# Allegro board DRV8711_TEST_V10A.brd
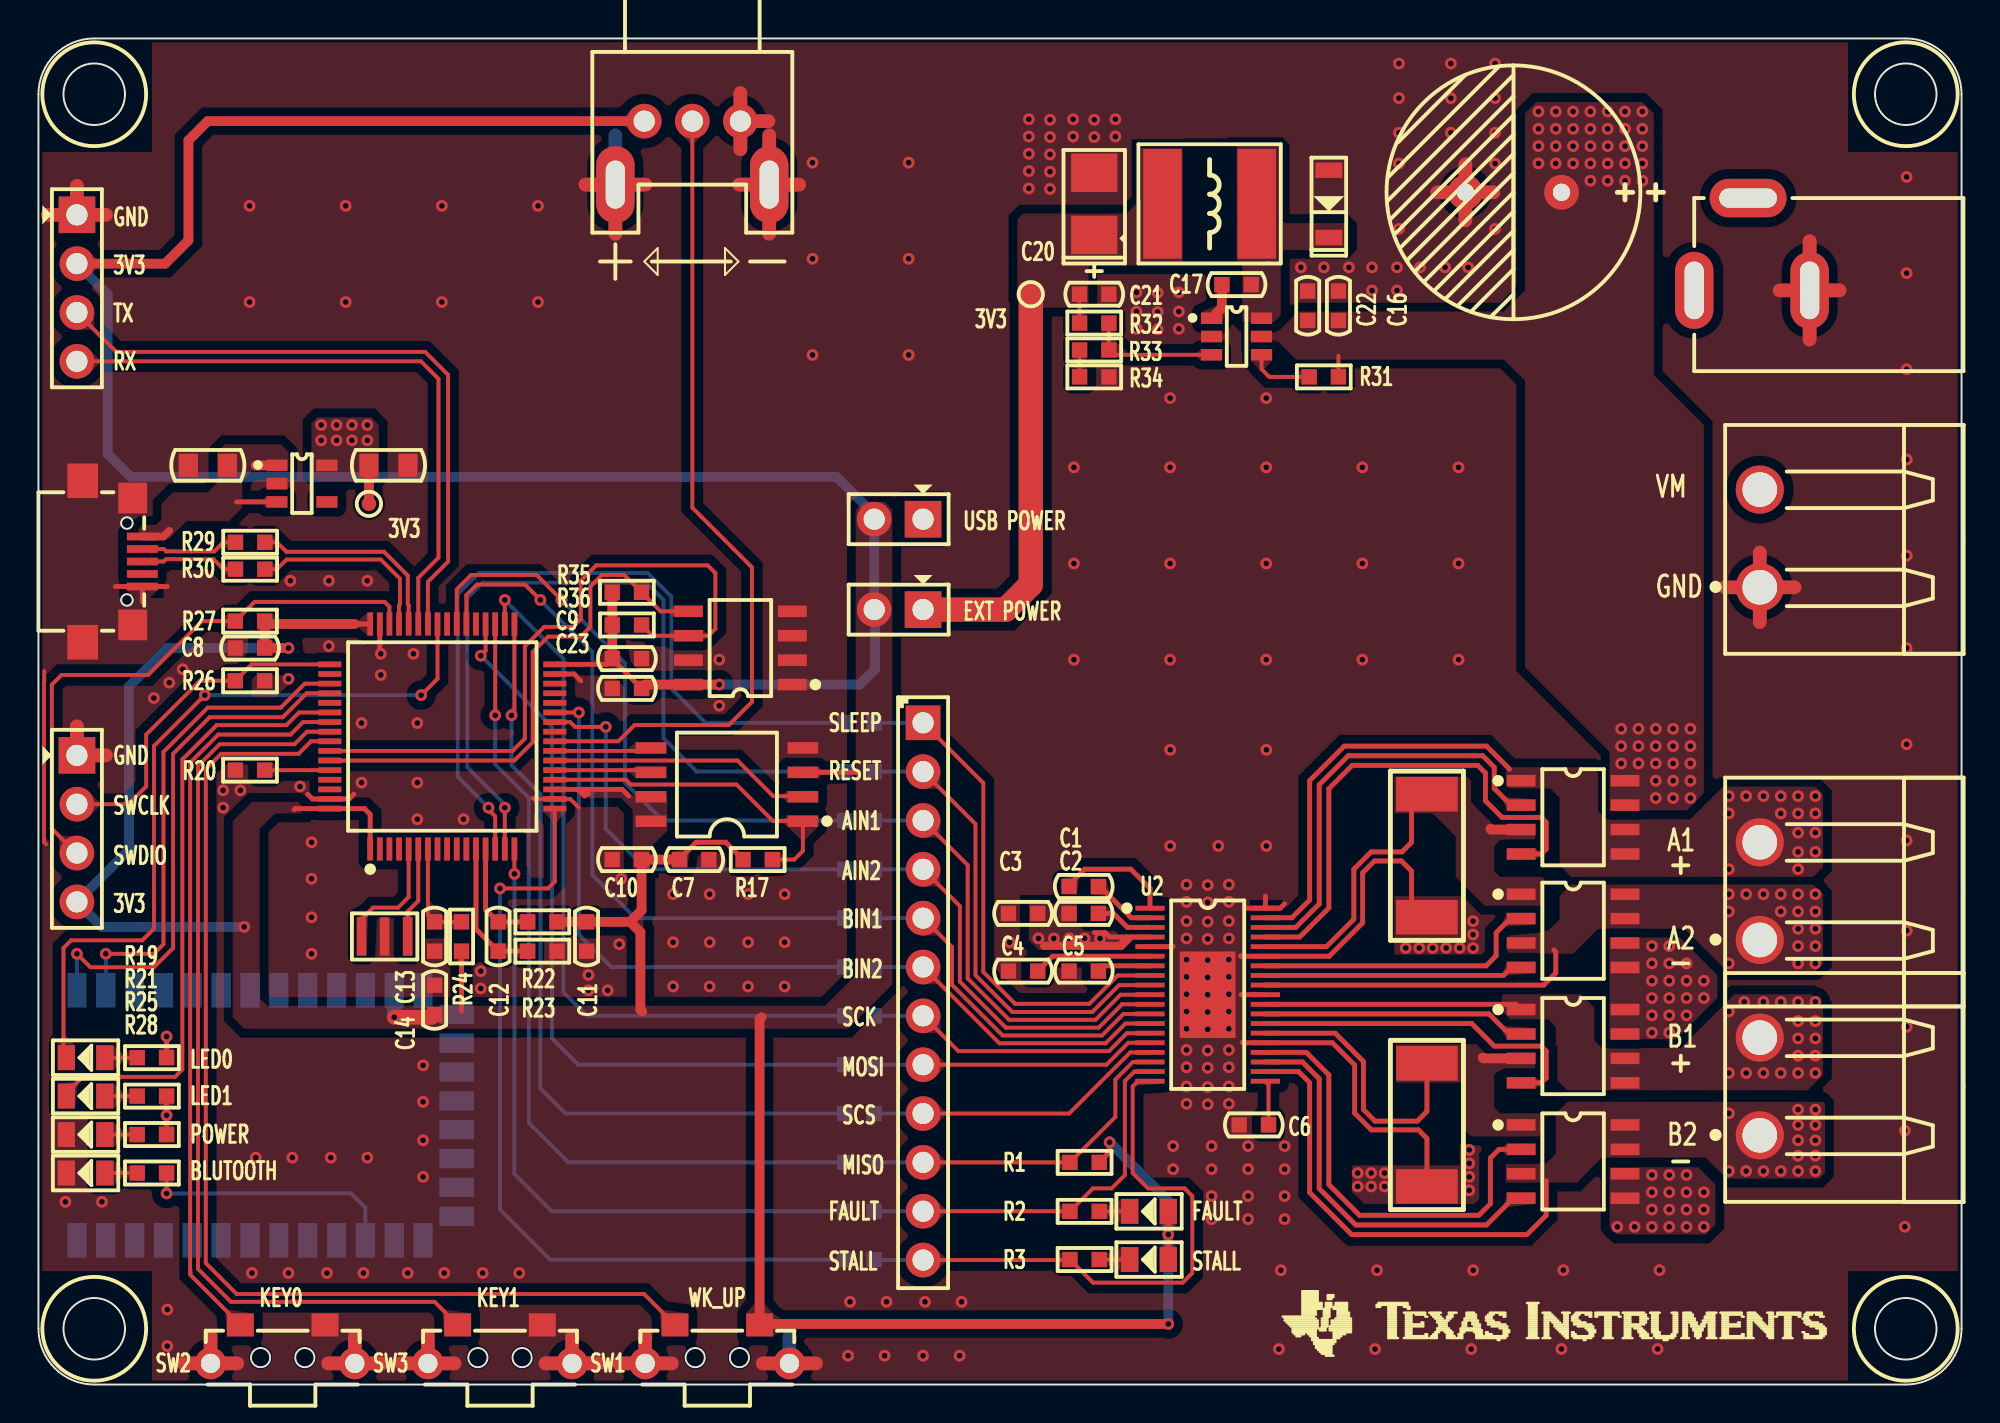
[diagram p0: board, top side]
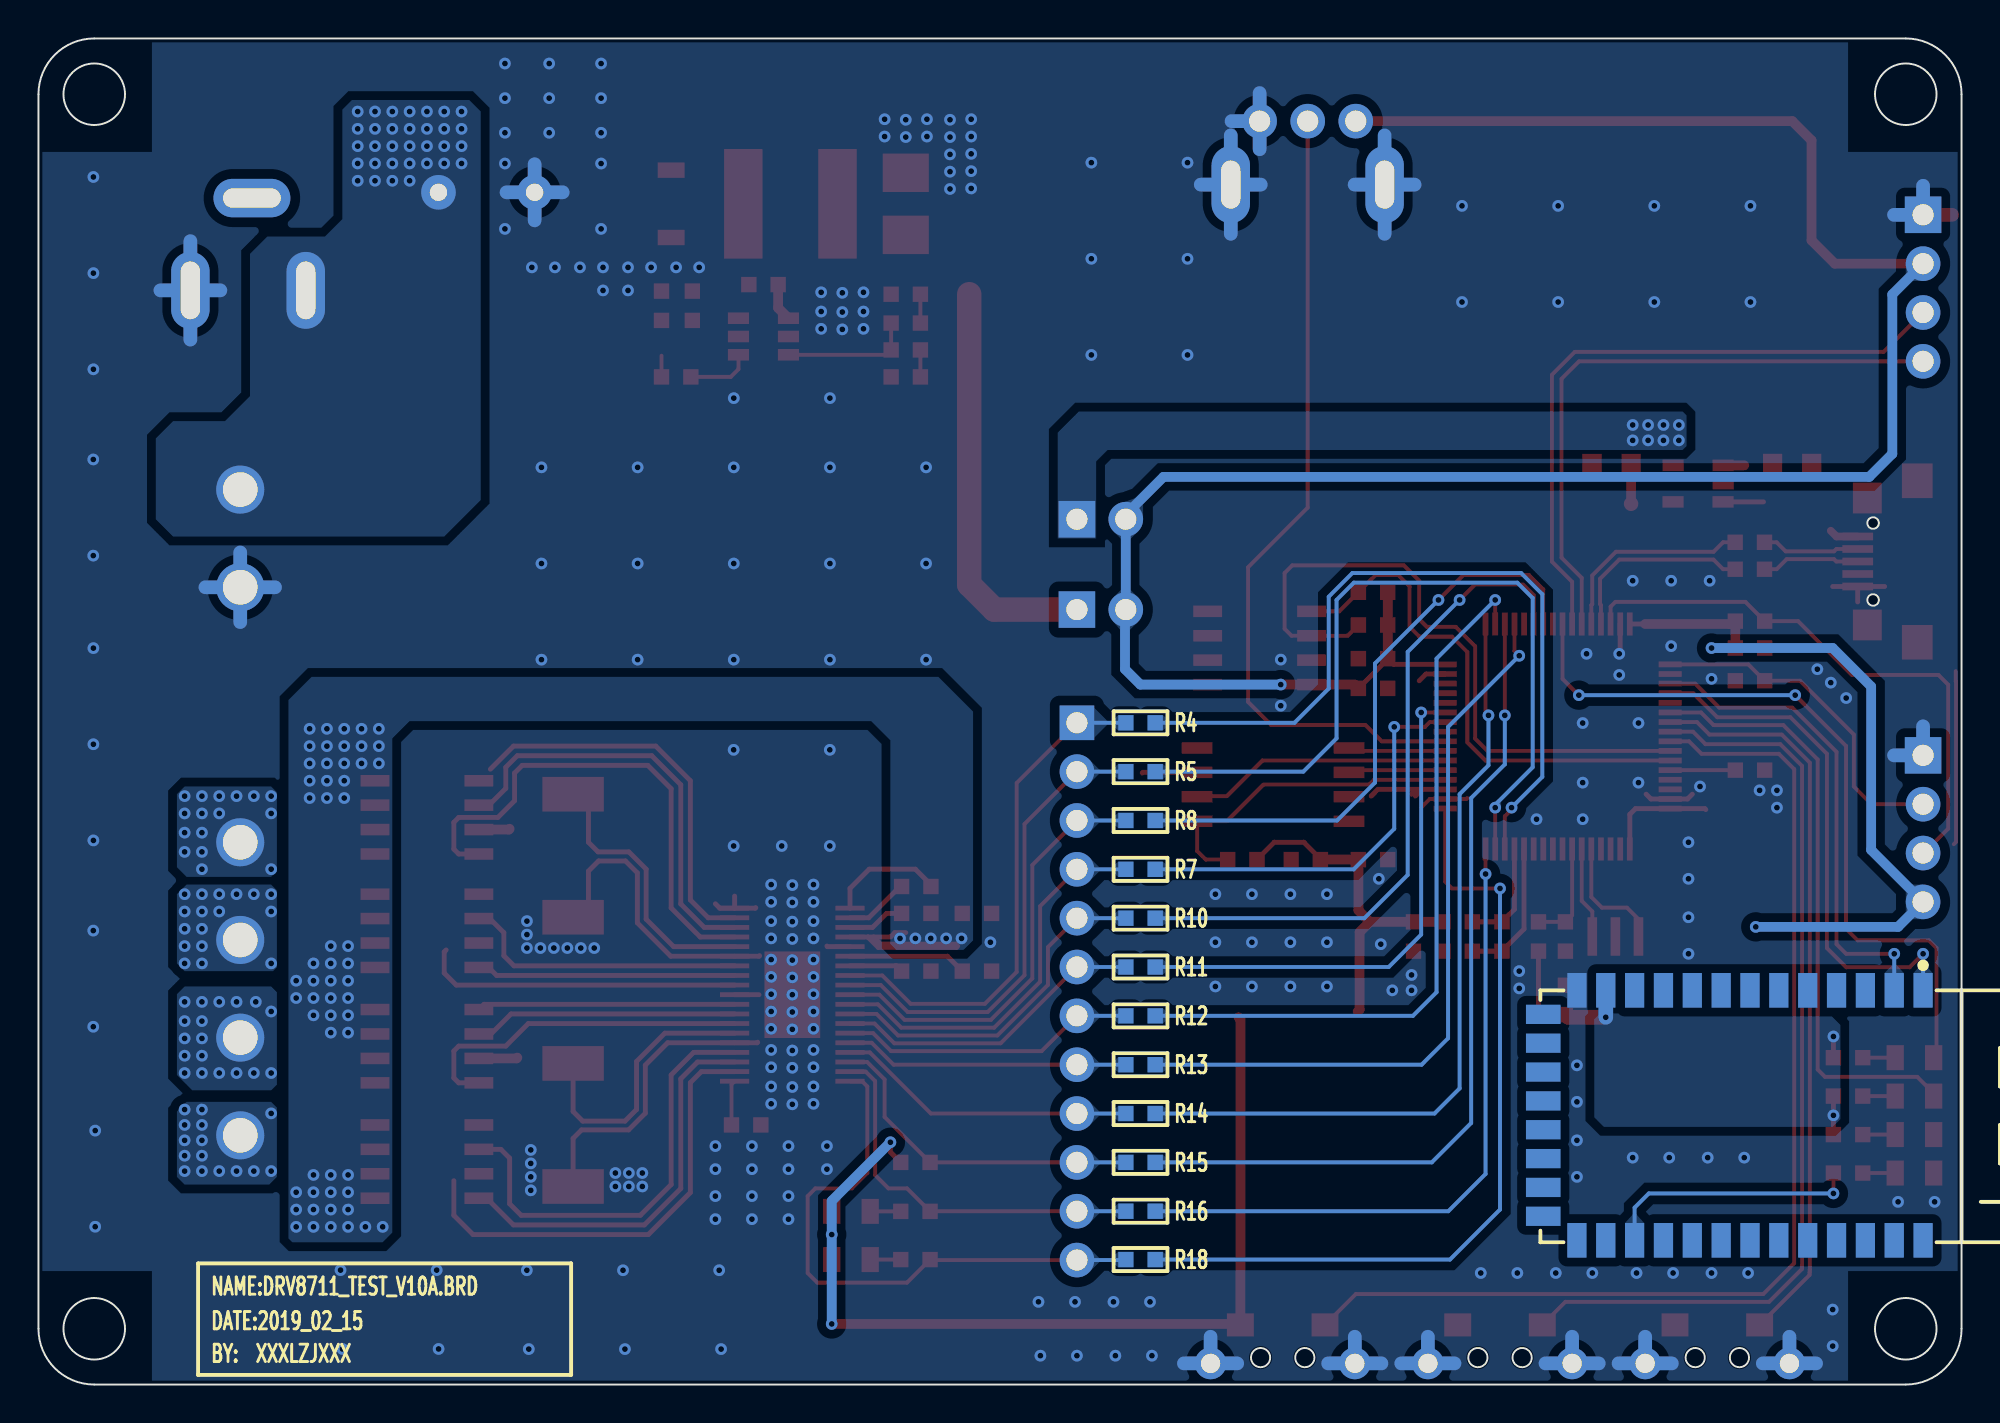
[diagram p1: board, bottom side, seen from below]

Outline 100 x 70 mm; copper layers: TOP, BOTTOM. Coordinates in mm from the lower left corner of the outline.
Outline path: circle c2.9,67.1 r1.6 ; circle c2.9,2.9 r1.6 ; circle c97.1,67.1 r1.6 ; circle c97.1,2.9 r1.6 ; 0,67.1 0,2.9 arc(0.85,0.85) 2.9,0 97.1,0 arc(99.15,0.85) 100,2.9 100,67.1 arc(99.15,69.15) 97.1,70 2.9,70 arc(0.85,69.15) 0,67.1

## Design rules (mm)
constraint set DEFAULT: min track width 0.203, pair gap 0.203
net group *USB_D: nets USB_D+ USB_D-
net group DP1: nets USB_DM USB_DP

## Placement (name value [footprint] x y rotation side)
C1  0.1uF_50V  [C0603]  54.35 25.9 0 top
C2  1uF_50V  [C0603]  54.35 24.5 180 top
C3  1uF_50V  [C0603]  51.2 24.5 180 top
C4  0.1uF_50V  [C0603]  51.2 21.5 180 top
C5  1uF_50V  [C0603]  54.35 21.5 180 top
C6  1nF_50V  [C0603]  63.2 13.5 0 top
C7  0.1uF_50V  [C0603]  34.1 27.3 0 top
C8  0.1uF_50V  [C0603]  11 38.3 0 top
C9  0.1uF_50V  [C0603]  30.6 37.75 180 top
C10  0.1uF_50V  [C0603]  30.6 27.3 0 top
C11  0.1uF_50V  [C0603]  28.5 23.3 90 top
C12  0.1uF_50V  [C0603]  23.9 23.3 90 top
C13  0.1uF_50V  [C0603]  20.6 23.3 270 top
C14  0.1uF_50V  [C0603]  20.6 20 270 top
C15  1000uF_50V  [CAP-5R0-13X27]  76.7 62 180 top
C16  10nF_50V  [C0603]  67.6 56.1 90 top
C17  10nF_50V  [C0603]  62.3 57.2 0 top
C18  10uF_25V  [C0805]  8.81 47.8 180 top
C19  10uF_25V  [C0805]  18.2 47.8 0 top
C20  47uF_10V  [C3528B]  54.9 61.4 270 top
C21  0.1uF_25V  [C0603]  54.9 56.7 0 top
C22  0.1uF_25V  [C0603]  66 56.1 90 top
C23  0.1uF_50V  [C0603]  30.6 36.2 0 top
D1  LED_GREEN  [LED0805]  57.75 9.01 180 top
D2  LED_GREEN  [LED0805]  57.75 6.5 180 top
D3  LED_GREEN  [LED0805]  2.45 17 180 top
D4  LED_GREEN  [LED0805]  2.45 15 180 top
D5  LED_GREEN  [LED0805]  2.45 13 180 top
D6  LED_GREEN  [LED0805]  2.45 11 180 top
D7  LMBR0520T1G  [SOD123]  67.1 61.4 90 top
DC1  -  [DC005]  92.1 56.9 180 top
J1  -  [HEADER12X1-2R54-M]  46 34.41 270 top
J2  -  [WJ2EDGRC-5R08-2P]  89.51 25.66 90 top
J3  -  [WJ2EDGRC-5R08-2P]  89.51 15.5 90 top
J4  -  [HEADER4X1-2R54-M]  2 32.72 270 top
J5  -  [HEADER4X1-2R54-M]  2 60.83 270 top
J6  -  [WJ2EDGRC-5R08-2P]  89.51 44 90 top
J7  -  [HEADER2X1-2R54-M]  46 45 180 top
J8  -  [HEADER2X1-2R54-M]  46 40.3 180 top
L1  SLF6028T-4R7M1R6-PF  [L6028]  60.9 61.4 180 top
NOREF  -  []  0 0 90 top
NOREF#2  -  []  98.12 68.33 0 top
NOREF#3  -  []  -0.21 0 0 top
NOREF#4  -  []  0 0 0 top
NOREF#5  -  []  0 0 0 top
NOREF#6  -  []  0 0 90 top
NOREF#7  -  []  0 0 90 top
NOREF#8  -  []  0 0 0 top
Q1  IRF7351TRPBF  [SOIC8]  79.8 29.5 270 top
Q2  IRF7351TRPBF  [SOIC8]  79.8 23.6 270 top
Q3  IRF7351TRPBF  [SOIC8]  79.8 17.6 270 top
Q4  IRF7351TRPBF  [SOIC8]  79.8 11.6 270 top
R1  4.7K  [R0603]  54.4 11.55 180 top
R2  10K  [R0603]  54.4 9.01 180 top
R3  10K  [R0603]  54.4 6.5 180 top
R4  0R  [R0603]  42.69 34.41 0 bottom
R5  0R  [R0603]  42.69 31.87 0 bottom
R6  0R05  [R2512]  72.2 27.5 90 top
R7  0R  [R0603]  42.69 26.79 0 bottom
R8  0R  [R0603]  42.69 29.33 0 bottom
R9  0R05  [R2512]  72.2 13.5 90 top
R10  0R  [R0603]  42.69 24.25 0 bottom
R11  0R  [R0603]  42.69 21.71 0 bottom
R12  0R  [R0603]  42.69 19.17 0 bottom
R13  0R  [R0603]  42.69 16.63 0 bottom
R14  0R  [R0603]  42.69 14.09 0 bottom
R15  0R  [R0603]  42.69 11.55 0 bottom
R16  0R  [R0603]  42.69 9.01 0 bottom
R17  10K  [R0603]  37.4 27.3 0 top
R18  0R  [R0603]  42.69 6.5 0 bottom
R19  10K  [R0603]  5.9 17 180 top
R20  10K  [R0603]  11 31.95 180 top
R21  10K  [R0603]  5.9 15 180 top
R22  0R  [R0603]  26.2 24.06 0 top
R23  0R  [R0603]  26.2 22.54 0 top
R24  10K  [R0603]  22 23.3 90 top
R25  10K  [R0603]  5.9 13 180 top
R26  10K  [R0603]  11 36.6 180 top
R27  10K  [R0603]  11 39.7 180 top
R28  10K  [R0603]  5.9 11 180 top
R29  0R  [R0603]  11.01 43.8 0 top
R30  0R  [R0603]  11.01 42.4 0 top
R31  100K  [R0603]  66.84 52.4 180 top
R32  49.9K  [R0603]  54.9 55.2 0 top
R33  6.2K  [R0603]  54.9 53.8 180 top
R34  10K  [R0603]  54.9 52.4 0 top
R35  4.7K  [R0603]  30.6 41.2 180 top
R36  4.7K  [R0603]  30.6 39.5 180 top
RP1  RK09K1110A0J  [R09-B103-3P]  34 65.7 180 top
SW1  -  [K2-1112SW-A4SW-04]  35.3 1.4 180 top
SW2  -  [K2-1112SW-A4SW-04]  12.7 1.4 180 top
SW3  -  [K2-1112SW-A4SW-04]  24 1.4 180 top
TP1  TestPoint  [TP-0R75]  17.18 45.8 0 top
TP2  TestPoint  [TP-0R75]  51.6 56.7 0 top
U1  STM32F103RCT6  [LQFP64-10X10X0R5]  21 33.7 0 top
U2  DRV8711DCPR  [HTSSOP38]  60.8 20.27 270 top
U3  W25Q64JVSSIQ  [SOIC8_208]  35.8 31.2 90 top
U4  -  [HC-06]  2 20.5 270 bottom
U5  RT9193-33GB  [SOT23-5]  13.7 46.85 270 top
U6  MP2359DJ-LF-Z  [SOT23-6]  62.3 54.5 270 top
U10  AT24C512C-SSHM-T  [SOIC8]  36.5 38.3 90 top
USB1  USB-MICRO  [USB-U-F-M5SS-W-1]  2.3 42.8 270 top
X1  CSTCE8M00G15C99-R0  [X-3P-3R2X1R3-SMD]  18 23.3 0 top

## Library data of the parts
C1-C12 C14 C16 C17 = CAP NP_2
C13 C21 C22 = CAP NP
C15 = CAPT_100UF_3528_6r3V_10%_LXXXX
C18 C19 C23 = CAP NP_3
C20 = TMP_154254
D1-D6 = LED_4
D7 = DIODE13_7
DC1 = DC005
J1 = CONN RCPT 12
J2 J3 J6 = CONN RCPT 2
J4 J5 = CONN RCPT 4
J7 J8 = HDR_1
L1 = INDUCTOR_0
Q1-Q4 = IRF7351TRPBF
R1-R36 = R_Generic
RP1 = RESISTOR VAR_1
SW1-SW3 = SWITCH-SPST-4P
TP1 TP2 = TestPoint
U1 = STM32F103RxT6
U2 = DRV8711DCPR
U3 = W25Qxx
U4 = HC-06_0
U5 = SPX3819M5-L-1-2
U6 = MP2359DJ-LF-Z
U10 = AT24C512
USB1 = USB-MICRO
X1 = XTAL_5032_0

## Footprints (pads in the part's own frame, mm; a bottom-side part is the same pattern mirrored in y, then rotated)
C0603
  rect 0.8x0.8 smd: 1(-0.762,0) 2(0.762,0)
C0805
  rect 1x1.2 smd: 1(-1.016,0) 2(1.016,0)
C3528B
  rect 2x2.4 smd: 1(1.615,0) 2(-1.614,0)
CAP-5R0-13X27
  round 1.8 hole 0.9: 1(-2.5,0) 2(2.5,0)
DC005
  oval 2x4 hole 1x3: 1(6,0) 2(0,0)
  oval 4x2 hole 3x1: 3(3.2,-4.8)
HC-06
  rect 1.8x1 smd: 1(0,0) 2(0,-1.5) 3(0,-3) 4(0,-4.5) 5(0,-6) 6(0,-7.5) 7(0,-9) 8(0,-10.5) 9(0,-12) 10(0,-13.5) 11(0,-15) 12(0,-16.5) 13(0,-18) 22(13,-18) 23(13,-16.5) 24(13,-15) 25(13,-13.5) 26(13,-12) 27(13,-10.5) 28(13,-9) 29(13,-7.5) 30(13,-6) 31(13,-4.5) 32(13,-3) 33(13,-1.5) 34(13,0)
  rect 1x1.8 smd: 14(1.25,-19.75) 15(2.75,-19.75) 16(4.25,-19.75) 17(5.75,-19.75) 18(7.25,-19.75) 19(8.75,-19.75) 20(10.25,-19.75) 21(11.75,-19.75)
HEADER2X1-2R54-M
  rect 1.9x1.9 hole 1.1: 1(0,0)
  round 1.8 hole 1.1: 2(2.54,0)
HEADER4X1-2R54-M
  rect 1.9x1.9 hole 1.1: 1(0,0)
  round 1.8 hole 1.1: 2(2.54,0) 3(5.08,0) 4(7.62,0)
HEADER12X1-2R54-M
  rect 1.8x1.8 hole 1.1: 1(0,0)
  round 1.8 hole 1.1: 2(2.54,0) 3(5.08,0) 4(7.62,0) 5(10.16,0) 6(12.7,0) 7(15.24,0) 8(17.78,0) 9(20.32,0) 10(22.86,0) 11(25.4,0) 12(27.94,0)
HTSSOP38
  rect 0.25x1.52 smd: 1(-4.5,-3) 2(-4,-3) 3(-3.5,-3) 4(-3,-3) 5(-2.5,-3) 6(-2,-3) 7(-1.5,-3) 8(-1,-3) 9(-0.5,-3) 10(0,-3) 11(0.5,-3) 12(1,-3) 13(1.5,-3) 14(2,-3) 15(2.5,-3) 16(3,-3) 17(3.5,-3) 18(4,-3) 19(4.5,-3) 20(4.5,3) 21(4,3) 22(3.5,3) 23(3,3) 24(2.5,3) 25(2,3) 26(1.5,3) 27(1,3) 28(0.5,3) 29(0,3) 30(-0.5,3) 31(-1,3) 32(-1.5,3) 33(-2,3) 34(-2.5,3) 35(-3,3) 36(-3.5,3) 37(-4,3) 38(-4.5,3)
  rect 4.5x2.9 smd: 39(0,0)
K2-1112SW-A4SW-04
  round 1.65 hole 1: 1(-3.75,0.3) 4(3.75,0.3)
  rect 1.4x1.2 smd: 2(-2.2,-1.7) 3(2.2,-1.7)
L6028
  rect 2x5.7 smd: 1(-2.45,0) 2(2.45,0)
LED0805
  rect 0.9x1.3 smd: 1(-1,0) 2(1,0)
LQFP64-10X10X0R5
  rect 0.3x1.2 smd: 1(-3.75,-5.85) 2(-3.25,-5.85) 3(-2.75,-5.85) 4(-2.25,-5.85) 5(-1.75,-5.85) 6(-1.25,-5.85) 7(-0.75,-5.85) 8(-0.25,-5.85) 9(0.25,-5.85) 10(0.75,-5.85) 11(1.25,-5.85) 12(1.75,-5.85) 13(2.25,-5.85) 14(2.75,-5.85) 15(3.25,-5.85) 16(3.75,-5.85) 33(3.75,5.85) 34(3.25,5.85) 35(2.75,5.85) 36(2.25,5.85) 37(1.75,5.85) 38(1.25,5.85) 39(0.75,5.85) 40(0.25,5.85) 41(-0.25,5.85) 42(-0.75,5.85) 43(-1.25,5.85) 44(-1.75,5.85) 45(-2.25,5.85) 46(-2.75,5.85) 47(-3.25,5.85) 48(-3.75,5.85)
  rect 1.2x0.3 smd: 17(5.85,-3.75) 18(5.85,-3.25) 19(5.85,-2.75) 20(5.85,-2.25) 21(5.85,-1.75) 22(5.85,-1.25) 23(5.85,-0.75) 24(5.85,-0.25) 25(5.85,0.25) 26(5.85,0.75) 27(5.85,1.25) 28(5.85,1.75) 29(5.85,2.25) 30(5.85,2.75) 31(5.85,3.25) 32(5.85,3.75) 49(-5.85,3.75) 50(-5.85,3.25) 51(-5.85,2.75) 52(-5.85,2.25) 53(-5.85,1.75) 54(-5.85,1.25) 55(-5.85,0.75) 56(-5.85,0.25) 57(-5.85,-0.25) 58(-5.85,-0.75) 59(-5.85,-1.25) 60(-5.85,-1.75) 61(-5.85,-2.25) 62(-5.85,-2.75) 63(-5.85,-3.25) 64(-5.85,-3.75)
R09-B103-3P
  round 1.8 hole 1.1: 1(-2.5,0) 2(0,0) 3(2.5,0)
  oval 2x4 hole 1x2.5: 4(-4,3.3) 5(4,3.3)
R0603
  rect 0.8x0.8 smd: 1(-0.762,0) 2(0.762,0)
R2512
  rect 1.8x3.2 smd: 1(-3.2,0) 2(3.2,0)
SOD123
  rect 0.8x1.4 smd: 1(1.75,0) 2(-1.75,0)
SOIC8
  rect 0.6x1.5 smd: 1(-1.9,-2.7) 2(-0.63,-2.7) 3(0.64,-2.7) 4(1.91,-2.7) 5(1.91,2.7) 6(0.64,2.7) 7(-0.63,2.7) 8(-1.9,2.7)
SOIC8_208
  rect 0.6x1.6 smd: 1(-1.905,-3.95) 2(-0.635,-3.95) 3(0.635,-3.95) 4(1.905,-3.95) 5(1.905,3.95) 6(0.635,3.95) 7(-0.635,3.95) 8(-1.905,3.95)
SOT23-5
  rect 0.6x1.1 smd: 1(-0.95,-1.3) 2(0,-1.3) 3(0.95,-1.3) 4(0.95,1.3) 5(-0.95,1.3)
SOT23-6
  rect 0.6x1.1 smd: 1(-0.95,-1.3) 2(0,-1.3) 3(0.95,-1.3) 4(0.95,1.3) 5(0,1.3) 6(-0.95,1.3)
TP-0R75
  round 0.75 smd: 1(0,0)
USB-U-F-M5SS-W-1
  rect 0.4x1.6 smd: 1(-1.3,3.1) 2(-0.65,3.1) 3(0,3.1) 4(0.65,3.1) 5(1.3,3.1)
  rect 1.6x1.5 smd: 6(-3.3,2.6) 7(3.3,2.6)
  rect 1.8x1.6 smd: 8(-4.2,0) 9(4.2,0)
WJ2EDGRC-5R08-2P
  round 2.5 hole 1.8: 1(-2.54,0) 2(2.54,0)
X-3P-3R2X1R3-SMD
  rect 0.5x2 smd: 1(-1.2,0) 2(0,0) 3(1.2,0)

## Nets
GND: C3.2 C4.2 C5.2 C6.1 C7.2 C8.1 C9.1 C10.1 C11.1 C13.2 C14.1 C15.2 C16.2 C18.2 C19.2 C20.2 C21.2 C22.2 C23.1 D5.2(CATHODE) D6.2(CATHODE) D7.1 DC1.2 J4.1 J5.1 J6.1 R6.1 R9.1 R20.2 R23.2 R26.1 R34.2 RP1.1 RP1.4 RP1.5 SW1.1 SW1.4 SW2.1 SW2.2 SW2.4 SW3.1 SW3.2 SW3.4 U1.18 U1.31 U1.47 U1.63(VSS_4) U2.5 U2.24 U2.29 U2.33 U2.38 U2.39 U3.4 U4.13 U5.2 U6.2 U10.1 U10.2 U10.3 U10.4 U10.7(WP) USB1.5 USB1.6 USB1.7 USB1.8 USB1.9 X1.2
VCC_3.3V: C7.1 C8.2 C9.2 C10.2 C11.2 C14.2 C23.2 D1.1 D2.1 J4.4 J5.2 J7.2 J8.2 R1.1 R17.1 R19.1 R21.1 R22.2 R24.1 R25.1 R27.1 R35.2 R36.2 RP1.3 SW1.2 U1.1 U1.19 U1.32 U1.48 U1.64 U3.3(W\P\) U3.7 U3.8 U4.12(VCC) U10.8
VCC_VBUS: C18.1 U5.1 U5.3 USB1.1(VBUS)
VDDA: C12.2 R22.1 U1.13
VSSA: C12.1 R23.1 U1.12
A1HS: Q1.2 U2.36
A1LS: Q1.4 U2.35
A2HS: Q2.4 U2.31
A2LS: Q2.2 U2.32
AISENP: Q1.3(S2) Q2.1 R6.2 U2.34
AOUT1: J2.2 Q1.1 Q1.5 Q1.6 U2.37
AOUT2: J2.1 Q2.3(S2) Q2.7 Q2.8 U2.30
B1HS: Q3.2 U2.27
B1LS: Q3.4 U2.26
B2HS: Q4.4 U2.22
B2LS: Q4.2 U2.23
BEMF: C6.2 U2.20
BIN1: J1.5 R10.2 U2.12
BIN2: J1.6 R11.2 U2.13
BISENP: Q3.3(S2) Q4.1 R9.2 U2.25
BOOT0: R20.1 U1.60
BOUT1: J3.2 Q3.1 Q3.5 Q3.6 U2.28
BOUT2: J3.1 Q4.3(S2) Q4.7 Q4.8 U2.21
DIR/AIN2: J1.4 R7.2 U2.11
IIC_SCL: R36.1 U1.58 U10.6
IIC_SDA: R35.1 U1.59 U10.5
KEY0: SW2.3 U1.55
KEY1: SW3.3 U1.56
LED0: D3.2(CATHODE) U1.41
LED1: D4.2(CATHODE) U1.54
NFAULT: J1.11 R2.2 R16.2 U2.18
NRST: C13.1 R24.2 U1.7
NSLEEP: J1.1 R4.2 U2.8
NSTALL: J1.12 R3.2 R18.2 U2.19
OSC_IN: U1.5 X1.1
OSC_OUT: U1.6 X1.3
POT: RP1.2(WIPER) U1.24
RESET: J1.2 R5.2 U2.9
SCLK: J1.7 R12.2 U2.14
SCS: J1.9 R14.2 U2.16
SDATI: J1.8 R13.2 U2.15
SDATO: J1.10 R1.2 R15.2 U2.17
SPI1_CS: R17.2 U1.20 U3.1
SPI1_MISO: U1.22 U3.2
SPI1_MOSI: U1.23 U3.5
SPI1_SCK: U1.21 U3.6
STEP/AIN1: J1.3 R8.2 U2.10
SWCLK: J4.2 R26.2 U1.49
SWDIO: J4.3 R27.2 U1.46
T_BIN1: R10.1 U1.38
T_BIN2: R11.1 U1.27
T_DIR/AIN2: R7.1 U1.26
T_NFAULT: R16.1 U1.16
T_NSLEEP: R4.1 U1.14
T_NSTALL: R18.1 U1.17
T_RESET: R5.1 U1.15
T_SCLK: R12.1 U1.34
T_SCS: R14.1 U1.33
T_SDATI: R13.1 U1.36
T_SDATO: R15.1 U1.35
T_STEP/AIN1: R8.1 U1.39
USART1_RX: J5.4 U1.43
USART1_TX: J5.3 U1.42
USART4_RX: U1.52 U4.1
USART4_TX: U1.51 U4.2
USB_D+: R30.1 USB1.3
USB_D-: R29.1 USB1.2
USB_DM: R29.2 U1.44
USB_DP: R30.2 U1.45
VM: C2.2 C3.1 C15.1 C16.1 C22.1 DC1.1 J6.2 Q1.7 Q1.8 Q2.5 Q2.6 Q3.7 Q3.8 Q4.5 Q4.6 R31.1 U2.4(VM) U6.5
WK_UP: SW1.3 U1.57
N16860643: C19.1 J7.1 TP1.1 U5.5(VOUT)
N17026698: D4.1 R21.2
N17026724: D5.1 R25.2
N17049848: C1.1 U2.1
N17049851: C1.2 U2.2
N17050982: C2.1 U2.3
N17051347: C4.1 U2.6
N17051352: C5.1 U2.7
N17052473: D1.2(CATHODE) R2.1
N17052478: D2.2(CATHODE) R3.1
N17062865: D3.1 R19.2
N17067272: C17.2 D7.2(CATHODE) L1.1 U6.6(SW)
N17067274: C17.1 U6.1
N17067309: C20.1 C21.1 J8.1 L1.2 R32.1 TP2.1
N17067388: R32.2 R33.1 U6.3
N17067392: R31.2 U6.4
N17068207: R33.2 R34.1
N17069780: D6.1 R28.2
N17069783: R28.1 U4.24

Pads without a net: DC1 3; U1 2 3 4 8 9 10 11 25 28 29 30 37 40 50 53 61 62; U4 3 4 5 6 7 8 9 10 11 14 15 16 17 18 19 20 21 22 23 25 26 27 28 29 30 31 32 33 34; U5 4; USB1 4

## Via types
v1: diameter 0.61, hole 0.305, TOP to BOTTOM, 445 vias

## Routing (per net, layer and track width the routed paths; a pad name or vN(x,y) marks a point on that pad's centre or on a via; arc(x,y) is an arc through that point)
GND: length 201
  TOP w0.203: 0.4,28.1 0.29,28.21 0.29,36.56 0.3,36.57 0.3,37.1 ; 25.7,30.5 25.75,30.45 U1.18 27.65,30.45 28.1,30
  TOP w0.254: USB1.5 4,41.5 ; USB1.5 6.7,41.5 ; USB1.5 5.4,40.7 ; U2.29 62.53,20.27 ; R9.1 72.2,12.8 71.76,13.24 69.31,13.24 68.44,14.11 68.44,16.61 67.28,17.77 U2.24 62.63,17.77 62.6,17.8 ; U2.38 64.57,24.77 64.8,25 ; U2.38 62.73,24.77 62.7,24.8 ; U2.38 63.8,25.4 ; R6.1 71.4,25.1 71.4,26.7 70.87,27.23 69.47,27.23 68.86,26.61 68.86,24.01 67.12,22.27 U2.33 62.53,22.27 62.5,22.3 ; 28.2,36.6 27.85,36.95 U1.31 ; 14,30.7 14.25,30.45 U1.63 16.15,30.45 16.4,30.7 ; U2.5 58.97,22.77 59,22.8 ; U1.47 17.75,38.05 v1(17.8,38)
  TOP w0.711: SW2.4 10.33,1.1 ; SW2.4 7.57,1.1 ; SW2.4 8.95,2.48 ; J5.1 3.51,60.83 ; J5.1 2,62.34 ; J5.1 0.49,60.83 ; SW2.1 16.45,2.48 ; SW2.1 17.83,1.1 ; SW2.1 15.07,1.1 ; RP1.5 31.56,62.4 ; RP1.5 30,59.84 ; RP1.5 28.44,62.4 ; DC1.2 92.1,59.46 ; DC1.2 92.1,54.34 ; DC1.2 93.66,56.9 ; DC1.2 90.54,56.9 ; 37.67,1.1 SW1.1 40.43,1.1 ; C15.2 75.66,62 ; C15.2 74.2,60.54 ; C15.2 74.2,63.46 ; C15.2 72.74,62 ; SW3.4 20.25,2.48 ; SW3.4 21.63,1.1 ; SW3.4 18.87,1.1 ; 38,59.84 RP1.4 ; RP1.4 36.44,62.4 ; RP1.4 38,64.96 ; RP1.4 39.56,62.4 ; 89.51,39.65 J6.1 ; J6.1 87.7,41.46 ; J6.1 91.32,41.46 ; J6.1 89.51,43.27 ; 26.37,1.1 SW3.1 ; SW3.1 27.75,2.48 ; SW3.1 29.13,1.1 ; SW1.4 32.93,1.1 ; SW1.4 31.55,2.48 ; SW1.4 30.17,1.1 ; RP1.1 37.96,65.7 ; RP1.1 36.5,67.16 ; RP1.1 36.5,64.24 ; 2,34.23 J4.1 3.51,32.72
  BOTTOM w0.711: SW3.1 27.75,2.48 ; SW3.1 26.37,1.1 ; SW3.1 29.13,1.1 ; DC1.2 93.66,56.9 ; DC1.2 92.1,59.46 ; DC1.2 92.1,54.34 ; DC1.2 90.54,56.9 ; 30.17,1.1 SW1.4 ; SW1.4 32.93,1.1 ; SW1.4 31.55,2.48 ; SW2.4 10.33,1.1 ; SW2.4 8.95,2.48 ; SW2.4 7.57,1.1 ; 38,59.84 RP1.4 ; RP1.4 38,64.96 ; RP1.4 39.56,62.4 ; RP1.4 36.44,62.4 ; 72.74,62 C15.2 ; C15.2 74.2,63.46 ; C15.2 75.66,62 ; C15.2 74.2,60.54 ; 89.51,39.65 J6.1 ; J6.1 89.51,43.27 ; J6.1 87.7,41.46 ; J6.1 91.32,41.46 ; SW3.4 20.25,2.48 ; SW3.4 21.63,1.1 ; SW3.4 18.87,1.1 ; 2,62.34 J5.1 3.51,60.83 ; 28.44,62.4 RP1.5 ; RP1.5 30,59.84 ; RP1.5 30,64.96 ; RP1.5 31.56,62.4 ; RP1.1 36.5,67.16 ; RP1.1 36.5,64.24 ; RP1.1 37.96,65.7 ; SW2.1 17.83,1.1 ; SW2.1 15.07,1.1 ; SW2.1 16.45,2.48 ; 37.67,1.1 SW1.1 ; SW1.1 39.05,2.48 ; SW1.1 40.43,1.1 ; 3.51,32.72 J4.1 2,34.23
  vias: v1(1.4,9.5) v1(3.3,9.5) v1(6,35.7) v1(6.7,3.9) v1(6.7,2) v1(6.8,36.5) v1(7.5,37.2) v1(9.6,30.9) v1(9.6,30) v1(10.5,30.9) v1(10.98,61.29) v1(10.98,56.29) v1(11.1,5.8) v1(11.3,11.8) v1(13,36.7) v1(13,5.8) v1(13.1,41.8) v1(13.2,11.8) v1(13.6,31.1) v1(14.2,28.2) v1(14.2,26.3) v1(14.2,24.3) v1(14.2,22.4) v1(15,5.8) v1(15.1,41.8) v1(15.1,38.4) v1(15.2,11.8) v1(15.98,61.29) v1(15.98,56.29) v1(16.8,34.4) v1(16.8,31.3) v1(16.9,5.8) v1(17.1,41.8) v1(17.1,11.8) v1(17.8,36.9) v1(19.2,5.8) v1(19.5,38) v1(19.7,34.4) v1(19.7,31.3) v1(19.7,29.4) v1(20,16.6) v1(20,14.7) v1(20,12.7) v1(20,10.8) v1(20.98,61.29) v1(20.98,56.29) v1(21.1,5.8) v1(22.1,29.4) v1(23,21.5) v1(23,20.6) v1(23.1,5.8) v1(25,5.8) v1(25.98,61.29) v1(25.98,56.29) v1(28.6,21.3) v1(28.6,20.5) v1(29.6,20.5) v1(30.2,22.9) v1(30.3,26.3) v1(33,25.5) v1(33,23) v1(33,20.7) v1(34.9,25.5) v1(34.9,23) v1(34.9,20.7) v1(35.4,37.7) v1(35.4,35.3) v1(36.9,25.5) v1(36.9,23) v1(36.9,20.7) v1(38.8,25.5) v1(38.8,23) v1(38.8,20.7) v1(40.25,63.54) v1(40.25,58.54) v1(40.25,53.54) v1(42.1,1.5) v1(42.2,4.3) v1(44,1.5) v1(44.1,4.3) v1(45.25,63.54) v1(45.25,58.54) v1(45.25,53.54) v1(46,1.5) v1(46.1,4.3) v1(47.9,1.5) v1(48,4.3) v1(50.5,23) v1(51.5,65.8) v1(51.5,64.9) v1(51.5,64) v1(51.5,63.1) v1(51.5,62.2) v1(52.6,65.77) v1(52.6,64.87) v1(52.6,63.97) v1(52.6,63.07) v1(52.6,62.17) v1(53.8,65.8) v1(53.8,64.9) v1(53.84,47.7) v1(53.84,42.7) v1(53.84,37.7) v1(54.9,65.77) v1(54.9,64.87) v1(56,65.8) v1(56,64.9) v1(57.1,56.8) v1(57.1,55.8) v1(57.1,54.9) v1(58.2,56.77) v1(58.2,55.77) v1(58.2,54.87) v1(58.84,51.3) v1(58.84,47.7) v1(58.84,42.7) v1(58.84,37.7) v1(58.85,33.01) v1(58.85,28.01) v1(59,12.4) v1(59,11.2) v1(59.3,56.8) v1(59.3,55.8) v1(59.3,54.9) v1(59.7,26) v1(59.7,25.1) v1(59.7,24.1) v1(59.7,23.2) v1(59.7,22.1) v1(59.7,21.2) v1(59.7,20.3) v1(59.7,19.4) v1(59.7,18.5) v1(59.7,17.4) v1(59.7,16.5) v1(59.7,15.5) v1(59.7,14.6) v1(60.8,25.97) v1(60.8,25.07) v1(60.8,24.07) v1(60.8,23.17) v1(60.8,22.07) v1(60.8,21.17) v1(60.8,20.27) v1(60.8,19.37) v1(60.8,18.47) v1(60.8,17.37) v1(60.8,16.47) v1(60.8,15.47) v1(60.8,14.57) v1(61,12.4) v1(61,11.2) v1(61,9.8) v1(61,8.6) v1(61.35,28.01) v1(61.9,26) v1(61.9,25.1) v1(61.9,24.1) v1(61.9,23.2) v1(61.9,22.1) v1(61.9,21.2) v1(61.9,20.3) v1(61.9,19.4) v1(61.9,18.5) v1(61.9,17.4) v1(61.9,16.5) v1(61.9,15.5) v1(61.9,14.6) v1(62.9,12.4) v1(62.9,11.2) v1(62.9,9.8) v1(62.9,8.6) v1(63.84,51.3) v1(63.84,47.7) v1(63.84,42.7) v1(63.84,37.7) v1(63.85,33.01) v1(63.85,28.01) v1(64.5,1.84) v1(64.6,5.94) v1(64.8,12.4) v1(64.8,11.2) v1(64.8,9.8) v1(64.8,8.6) v1(65.64,58.1) v1(66.84,58.1) v1(68.14,58.1) v1(68.6,11) v1(68.6,10.3) v1(68.84,47.7) v1(68.84,42.7) v1(68.84,37.7) v1(69.34,58.1) v1(69.34,56.9) v1(69.3,11) v1(69.3,10.3) v1(69.5,1.84) v1(69.6,5.94) v1(70,11) v1(70,10.3) v1(70.64,58.1) v1(70.64,56.9) v1(70.74,68.7) v1(70.74,66.9) v1(70.74,65.1) v1(70.74,63.5) v1(70.74,60.1) v1(71.1,22.7) v1(71.84,58.1) v1(71.8,22.7) v1(72.5,22.7) v1(73.14,58.1) v1(73.2,22.7) v1(73.44,68.7) v1(73.44,66.9) v1(73.44,65.1) v1(73.84,47.7) v1(73.84,42.7) v1(73.84,37.7) v1(73.9,22.7) v1(74.34,58.1) v1(74.4,12.2) v1(74.4,11.5) v1(74.4,10.8) v1(74.4,10.1) v1(74.5,1.84) v1(74.6,24.1) v1(74.6,23.4) v1(74.6,22.7) v1(74.6,5.94) v1(75.74,68.7) v1(75.74,66.9) v1(75.74,65.1) v1(75.74,63.5) v1(75.74,60.1) v1(79.19,1.85) v1(79.29,5.95) v1(84.19,1.85) v1(84.29,5.95) v1(97.14,62.8) v1(97.14,57.8) v1(97.14,52.8) v1(97.14,38.3) v1(97.14,33.3) v1(97.14,28.3) v1(97.05,13.21) v1(97.05,8.21) v1(97.15,48.11) v1(97.15,43.11) v1(97.15,23.61) v1(97.15,18.61)
VCC_3.3V: length 249.1
  TOP w0.254: 42.6,31.8 42.56,31.84 U3.3 ; 28.35,30.95 28.6,30.7 ; 28.35,30.95 28.05,30.95 ; 28.35,30.95 30.35,30.95 30.7,30.6 ; R24.1 22,19.4 ; 16.45,39.55 U1.48 ; 28.05,30.95 28.4,30.6 ; 28.05,30.95 U1.19 ; U1.1 17.25,29.65 16.95,29.95 U1.64 13.35,29.95 13.3,29.9 ; C23.2 29.84,37.72 C9.2 29.54,37.45 U1.32 ; D1.1 v1(58.75,7.8) D2.1 ; R1.1 55.7,12.09 v1(55.7,12.6) ; R19.1 v1(6.66,18.1) ; R25.1 v1(6.66,14) R21.1 ; R17.1 35.74,28.2 34.2,28.2 33.34,27.34 C7.1 ; 31.3,27.24 C10.2
  TOP w0.508: 16.45,39.55 11.91,39.55 R27.1 C8.2 v1(13,38.3) ; v1(58.75,3.15) 37.55,3.15 SW1.2 37.5,19 37.6,19.1 ; RP1.3 8.8,65.7 7.8,64.7 7.8,59.5 6.59,58.29 J5.2 ; 30.76,24.06 C11.2 R22.2 ; 30.76,24.06 31.36,24.66 C10.2 C7.1 ; 30.76,24.06 31.3,23.52 31.3,19.5 31.4,19.4 ; R35.2 R36.2 C9.2 ; v1(35.4,36.4) U10.8 31.56,36.4 C23.2
  TOP w0.762: C14.2 20.46,19.1 v1(18.5,19.1)
  BOTTOM w0.508: v1(58.75,3.15) v1(58.75,7.8) 58.75,9.55 v1(55.7,12.6) ; v1(13,38.3) 6.7,38.3 4.7,36.3 4.7,27.8 J4.4 3.3,23.8 v1(10.7,23.8) ; v1(35.4,36.4) 42.7,36.4 43.5,37.2 43.5,40.26 J8.2 J7.2 43.46,45.24 41.5,47.2 4.8,47.2 3.6,48.4 3.6,56.69 J5.2
  BOTTOM w0.762: U4.12 v1(18.5,19.1)
VCC_VBUS: length 4.7
  TOP w0.254: U5.3 10.3,45.9
  TOP w0.4: USB1.1 6.5,44.1 6.8,44.4
  TOP w0.508: U5.1 11.3,47.8
VDDA: length 5.6
  TOP w0.254: U1.13 23.25,24.71 C12.2 R22.1
VSSA: length 7.3
  TOP w0.254: R23.1 C12.1 22.75,23.69 U1.12
A1HS: length 22.3
  TOP w0.254: Q1.2 76.57,30.13 75.7,31 75.7,32.1 75.1,32.7 68.11,32.7 66.6,31.19 66.6,24.99 65.38,23.77 U2.36
A1LS: length 26.8
  TOP w0.254: U2.35 65.59,23.27 67.1,24.79 67.1,30.99 68.31,32.2 74.84,32.2 75.24,31.8 75.24,30.36 76.11,29.49 78.15,29.49 78.4,29.24 78.4,27.84 78.15,27.59 Q1.4
A2HS: length 13.5
  TOP w0.254: U2.31 76.17,21.27 76.59,21.69 Q2.4
A2LS: length 15
  TOP w0.254: U2.32 75.27,21.77 75.8,22.3 75.8,23.5 76.53,24.23 Q2.2
AISENP: length 16.3
  TOP w0.254: 71.8,30.4 72.1,30.7 R6.2 71.4,29.9 71.4,28.2 70.9,27.7 69.3,27.7 68.4,26.8 68.4,24.2 66.97,22.77 U2.34
  TOP w0.508: Q1.3 75.54,28.86 75.5,28.9
AOUT1: length 20.5
  TOP w0.254: U2.37 65.17,24.27 66.1,25.2 66.1,31.4 67.9,33.2 75.3,33.2 76.5,32
  vias: v1(87.9,30.6) v1(87.9,29.7) v1(87.9,26.8) v1(88.8,30.6) v1(89.7,30.6) v1(90.6,30.6) v1(90.6,29.7) v1(91.5,30.6) v1(91.5,29.7) v1(91.5,28.7) v1(91.5,27.7) v1(91.5,26.8) v1(92.4,30.6) v1(92.4,29.7) v1(92.4,28.7) v1(92.4,27.7)
AOUT2: length 16.6
  TOP w0.254: U2.30 78.27,20.77 78.9,21.4 78.9,22.5 78.8,22.6
  vias: v1(87.9,25.5) v1(87.9,24.6) v1(87.9,21.9) v1(88.8,25.5) v1(89.7,25.5) v1(90.6,25.5) v1(90.6,24.6) v1(91.5,25.5) v1(91.5,24.6) v1(91.5,23.7) v1(91.5,22.8) v1(91.5,21.9) v1(92.4,25.5) v1(92.4,24.6) v1(92.4,23.7) v1(92.4,22.8) v1(92.4,21.9)
B1HS: length 13.7
  TOP w0.254: Q3.2 76.47,18.23 75.43,19.27 U2.27
B1LS: length 18
  TOP w0.254: Q3.4 78.15,15.69 78.4,15.94 78.4,17.35 78.15,17.6 75.7,17.6 74.53,18.77 U2.26
B2HS: length 20.7
  TOP w0.254: U2.22 65.73,16.77 66.6,15.9 66.6,10.19 68.49,8.3 75.3,8.3 76.69,9.69 Q4.4
B2LS: length 23
  TOP w0.254: Q4.2 75.95,12.23 75.5,11.78 75.5,9.4 74.9,8.8 68.7,8.8 67.1,10.4 67.1,16.1 65.93,17.27 U2.23
BEMF: length 2.3
  TOP w0.203: C6.2 63.96,15.61 U2.20
BIN1: length 18.5
  TOP w0.203: U2.12 56.42,19.27 55.3,18.15 50.14,18.15 47.51,20.78 47.51,22.75 J1.5
  BOTTOM w0.203: R10.2 J1.5
BIN2: length 16.4
  TOP w0.203: U2.13 56.52,18.77 55.5,17.75 49.97,17.75 J1.6
  BOTTOM w0.203: R11.2 J1.6
BISENP: length 16.5
  TOP w0.254: U2.25 67.43,18.27 68.9,16.8 68.9,14.3 69.5,13.7 71.7,13.7 72.2,14.2 R9.2
  TOP w0.508: 75.1,17 75.14,16.96 Q3.3
BOOT0: length 3.4
  TOP w0.203: U1.60 R20.1
BOUT1: length 13.4
  TOP w0.254: U2.28 76.83,19.77 Q3.1
  vias: v1(87.9,19.4) v1(87.9,16.2) v1(88.7,19.9) v1(88.8,16.2) v1(89.7,19.9) v1(89.7,16.2) v1(90.6,19.9) v1(90.6,16.2) v1(91.5,19.9) v1(91.5,18.9) v1(91.5,18) v1(91.5,17.1) v1(91.5,16.2) v1(92.4,19.9) v1(92.4,18.9) v1(92.4,18) v1(92.4,17.1) v1(92.4,16.2)
BOUT2: length 23.7
  TOP w0.254: 78.4,10.6 78.4,8.8 77.4,7.8 68.29,7.8 66.1,9.99 66.1,15.7 65.53,16.27 U2.21
  vias: v1(87.9,14.1) v1(87.9,11.1) v1(88.8,11.1) v1(89.7,11.1) v1(90.6,11.1) v1(91.5,14.3) v1(91.5,13.5) v1(91.5,12.7) v1(91.5,11.9) v1(91.5,11.1) v1(92.4,14.3) v1(92.4,13.5) v1(92.4,12.7) v1(92.4,11.9) v1(92.4,11.1)
DIR/AIN2: length 20.6
  TOP w0.203: U2.11 56.35,19.77 55.13,18.56 50.3,18.56 47.91,20.95 47.91,24.88 J1.4
  BOTTOM w0.203: R7.2 J1.4
IIC_SCL: length 35.3
  TOP w0.203: R36.1 31.92,38.94 U10.6 34.84,38.94 35.2,39.3 35.2,42.2 34.8,42.6 29,42.6 28.2,41.8 28.2,39.8 27.8,39.4 26.3,39.4 25.29,38.39 25.29,33.59 24.65,32.95 U1.58
IIC_SDA: length 27.4
  TOP w0.203: U1.59 24.75,32.45 25.7,33.4 25.7,38.09 26.5,38.89 28.19,38.89 28.7,39.4 28.7,41.5 29.3,42.1 30.46,42.1 R35.1 32.35,40.21 U10.5
KEY0: length 38.5
  TOP w0.203: U1.55 13.76,34.45 13.11,33.8 9.35,33.8 7.89,32.34 7.89,5.98 7.89,5.97 7.89,5.84 7.9,5.83 7.9,5.7 SW2.3
KEY1: length 48.5
  TOP w0.203: U1.56 13.96,33.95 13.31,33.3 9.43,33.3 8.29,32.17 8.29,6.15 8.3,6.14 8.3,6.01 10.01,4.3 20.6,4.3 SW3.3
LED0: length 39.4
  TOP w0.203: D3.2 1.45,17.15 1.3,17.3 1.3,22.7 1.7,23.1 5.4,23.1 6.01,23.71 6.01,33.21 v1(8.65,35.85) ; U1.41 20.75,36.7 v1(19.9,35.85)
  BOTTOM w0.203: v1(19.9,35.85) v1(8.65,35.85)
LED1: length 31.5
  TOP w0.203: U1.54 13.55,34.95 12.9,34.3 12.87,34.3 12.87,34.29 9.27,34.29 7.48,32.51 7.48,16.38 7.1,16 2.3,16 1.45,15.15 D4.2
NFAULT: length 20.2
  TOP w0.203: J1.11 53.63,9.01 R2.2 54.83,10.2 55.8,10.2 56.49,10.89 56.49,15.78 56.98,16.27 U2.18
  BOTTOM w0.203: R16.2 J1.11
NRST: length 5.3
  TOP w0.203: U1.7 20.25,24.41 C13.1 R24.2
NSLEEP: length 26.8
  TOP w0.203: J1.1 49.13,31.28 49.13,21.45 50.79,19.8 54.65,19.8 56.12,21.27 U2.8
  BOTTOM w0.203: R4.2 J1.1
NSTALL: length 30.4
  TOP w0.203: J1.12 53.61,6.47 R3.2 54.84,5.3 59.5,5.3 60,5.8 60,9.8 59.6,10.2 57.7,10.2 56.9,11 56.9,15.5 57.17,15.77 U2.19
  BOTTOM w0.203: R18.2 43.48,6.47 J1.12
OSC_IN: length 6.3
  TOP w0.203: U1.5 19.25,25.35 18.7,24.8 17.4,24.8 16.8,24.2 X1.1
OSC_OUT: length 4.8
  TOP w0.203: X1.3 19.2,24.6 19.75,25.15 U1.6
POT: length 42.6
  TOP w0.203: RP1.2 34,45.6 37.1,42.5 37.1,35.5 35.9,34.3 31,34.3 30.15,33.45 U1.24
RESET: length 24.7
  TOP w0.203: U2.9 56.2,20.77 54.79,19.37 50.64,19.37 48.73,21.29 48.73,29.15 J1.2
  BOTTOM w0.203: R5.2 J1.2
SCLK: length 15.5
  TOP w0.203: U2.14 56.6,18.27 55.66,17.34 47.83,17.34 J1.7
  BOTTOM w0.203: R12.2 J1.7
SCS: length 15.7
  TOP w0.203: U2.16 56.77,17.27 53.59,14.09 J1.9
  BOTTOM w0.203: R14.2 J1.9
SDATI: length 14.8
  TOP w0.203: J1.8 55.53,16.63 56.67,17.77 U2.15
  BOTTOM w0.203: R13.2 J1.8
SDATO: length 17.6
  TOP w0.203: U2.17 56.91,16.77 56,15.86 56,13.91 R1.2 J1.10
  BOTTOM w0.203: R15.2 J1.10
SPI1_CS: length 17.1
  TOP w0.203: R17.2 39.3,27.3 39.75,27.75 39.75,29.3 39.74,29.3 38.2,29.3 36.3,31.2 30.8,31.2 30.55,31.45 U1.20
SPI1_MISO: length 13.7
  TOP w0.203: U3.2 39.72,30.6 38.2,30.6 36.35,32.45 U1.22
SPI1_MOSI: length 5.1
  TOP w0.203: U3.5 31.7,32.95 U1.23
SPI1_SCK: length 5
  TOP w0.203: U1.21 31.73,31.95 U3.6
STEP/AIN1: length 22.6
  TOP w0.203: J1.3 48.32,27.01 48.32,21.12 50.47,18.96 54.96,18.96 56.27,20.27 U2.10
  BOTTOM w0.203: R8.2 J1.3
SWCLK: length 17.7
  TOP w0.203: U1.49 11.09,37.45 R26.2 8.4,36.6 5.6,33.8 5.6,31.1 4.68,30.18 J4.2
SWDIO: length 29.7
  TOP w0.203: U1.46 18.25,40.45 18,40.7 11.24,40.7 R27.2 8.5,39.7 5.7,36.9 1.2,36.9 0.69,36.39 0.69,28.91 1.96,27.64 J4.3
T_BIN1: length 35.4
  TOP w0.203: v1(26.1,40.8) 25.3,41.6 22.8,41.6 22.25,41.05 U1.38
  BOTTOM w0.203: v1(26.1,40.8) 28.8,38.1 28.8,26.5 31.05,24.25 R10.1
T_BIN2: length 27.3
  TOP w0.203: U1.27 v1(28.1,34.95)
  BOTTOM w0.203: v1(28.1,34.95) 28.1,23.4 29.79,21.71 R11.1
T_DIR/AIN2: length 21.4
  TOP w0.203: U1.26 27.65,34.45 27.9,34.2 v1(29.5,34.2)
  BOTTOM w0.203: R7.1 31.61,26.79 29.5,28.9 v1(29.5,34.2)
T_NFAULT: length 34.9
  TOP w0.203: U1.16 v1(24.75,26.55)
  BOTTOM w0.203: v1(24.75,26.55) 24.75,10.95 26.69,9.01 R16.1
T_NSLEEP: length 40.7
  TOP w0.203: U1.14 23.75,29.55 23.4,29.9 v1(23.4,30)
  BOTTOM w0.203: v1(23.4,30) 21.8,31.6 21.8,41.1 22.9,42.2 31.67,42.2 32.91,40.97 32.91,36.19 34.69,34.41 R4.1
T_NSTALL: length 42.5
  TOP w0.203: v1(24,25.8) 26.5,25.8 26.85,26.15 U1.17
  BOTTOM w0.203: R18.1 26.6,6.5 24,9.1 v1(24,25.8)
T_RESET: length 42.1
  TOP w0.203: v1(24.25,30) U1.15
  BOTTOM w0.203: v1(24.25,30) 24.25,30.15 22.3,32.1 22.3,40.9 23.1,41.7 31.6,41.7 32.5,40.8 32.5,33.6 34.23,31.87 R5.1
T_SCLK: length 38.1
  TOP w0.203: v1(24.25,40.8) U1.34
  BOTTOM w0.203: R12.1 28.53,19.17 27.3,20.4 27.3,37.75 v1(24.25,40.8)
T_SCS: length 41.2
  TOP w0.203: v1(24.6,34.8) 24.75,34.95 U1.33
  BOTTOM w0.203: R14.1 27.41,14.09 26.1,15.4 26.1,30.7 24.6,32.2 v1(24.6,34.8)
T_SDATI: length 39
  TOP w0.203: v1(23,37.9) 23.25,38.15 U1.36
  BOTTOM w0.203: v1(23,37.9) 26.7,34.2 26.7,18.01 28.07,16.63 R13.1
T_SDATO: length 44
  TOP w0.203: v1(23.75,34.8) U1.35
  BOTTOM w0.203: v1(23.75,34.8) 23.75,32.25 25.5,30.5 25.5,13.6 27.55,11.55 R15.1
T_STEP/AIN1: length 31.2
  TOP w0.203: U1.39 21.75,41.35 22.5,42.1 25.9,42.1 v1(27.2,40.8)
  BOTTOM w0.203: v1(27.2,40.8) 30.5,37.5 30.5,31.3 32.47,29.33 R8.1
USART1_RX: length 32.4
  TOP w0.203: J5.4 19.89,53.21 20.8,52.3 20.8,43 19.75,41.95 U1.43
USART1_TX: length 34
  TOP w0.203: U1.42 20.25,41.74 21.3,42.79 21.3,52.51 20.11,53.7 4.05,53.7 J5.3
USART4_RX: length 27.2
  TOP w0.203: U1.52 13.95,35.95 12.7,34.7 8.9,34.7 7,32.8 7,22.7 6,21.7 2.7,21.7 v1(2,22.4)
  BOTTOM w0.203: U4.1 v1(2,22.4)
USART4_TX: length 25.2
  TOP w0.203: v1(3.5,22.4) 6,22.4 6.5,22.9 6.5,32.9 8.8,35.2 12.6,35.2 13.85,36.45 U1.51
  BOTTOM w0.203: U4.2 v1(3.5,22.4)
USB_D+: length 5.1
  TOP w0.203: USB1.3 6.51,42.8 6.63,42.92 9.1,42.92 9.62,42.4 R30.1
USB_D-: length 5.1
  TOP w0.203: R29.1 9.62,43.8 9.15,43.33 6.63,43.33 6.51,43.45 USB1.2
USB_DM: length 10.7
  TOP w0.203: R29.2 12.4,43.8 12.89,43.31 17.97,43.31 19.2,42.07 19.2,40.58 19.25,40.53 U1.44
USB_DP: length 10
  TOP w0.203: U1.45 18.75,40.53 18.8,40.58 18.8,41.9 17.8,42.9 12.9,42.9 12.4,42.4 R30.2
VM: length 13.4
  TOP w0.203: R31.1 67.6,53.5
  TOP w0.254: 52.3,22.9 56.2,22.9 56.57,23.27 ; 52.2,22.8 52.27,22.73 56.33,22.73 56.87,23.27 ; 56.87,23.27 U2.4 ; 56.87,23.27 56.57,23.27 ; 56.57,23.27 55.7,23.27 55.47,23.5 54.9,23.5
  vias: v1(52,23.2) v1(52.8,23.2) v1(53.6,23.2) v1(54.4,23.2) v1(55.2,23.2) v1(78,66.2) v1(78,65.3) v1(78,64.4) v1(78,63.5) v1(78.9,66.2) v1(78.9,65.3) v1(78.9,64.4) v1(78.9,63.5) v1(79.8,66.2) v1(79.8,65.3) v1(79.8,64.4) v1(79.8,63.5) v1(80.7,66.2) v1(80.7,65.3) v1(80.7,64.4) v1(80.7,63.5) v1(80.7,62.6) v1(81.6,66.2) v1(81.6,65.3) v1(81.6,64.4) v1(81.6,63.5) v1(81.6,62.6) v1(82.1,8.2) v1(82.3,34.1) v1(82.3,33.2) v1(82.3,32.3) v1(82.5,66.2) v1(82.5,65.3) v1(82.5,64.4) v1(82.5,63.5) v1(82.5,62.6) v1(83,8.2) v1(83.2,34.1) v1(83.2,33.2) v1(83.2,32.3) v1(83.4,66.2) v1(83.4,65.3) v1(83.4,64.4) v1(83.4,63.5) v1(83.4,62.6) v1(83.9,22.8) v1(83.9,21.9) v1(83.9,21) v1(83.9,20.1) v1(83.9,19.2) v1(83.9,18.3) v1(83.9,10.9) v1(83.9,10) v1(83.9,9.1) v1(83.9,8.2) v1(84.1,34.1) v1(84.1,33.2) v1(84.1,32.3) v1(84.1,31.4) v1(84.1,30.5) v1(84.8,22.8) v1(84.8,21.9) v1(84.8,21) v1(84.8,20.1) v1(84.8,19.2) v1(84.8,18.3) v1(84.8,10.9) v1(84.8,10) v1(84.8,9.1) v1(84.8,8.2) v1(85,34.1) v1(85,33.2) v1(85,32.3) v1(85,31.4) v1(85,30.5) v1(85.7,21.9) v1(85.7,21) v1(85.7,20.1) v1(85.7,19.2) v1(85.7,10.9) v1(85.7,10) v1(85.7,9.1) v1(85.7,8.2) v1(85.9,34.1) v1(85.9,33.2) v1(85.9,32.3) v1(85.9,31.4) v1(85.9,30.5) v1(86.6,21) v1(86.6,20.1) v1(86.6,10) v1(86.6,9.1) v1(86.6,8.2)
WK_UP: length 58.5
  TOP w0.203: SW1.3 31.49,4.71 10.31,4.71 8.7,6.31 8.7,32 9.5,32.8 13.52,32.8 14.17,33.45 U1.57
N16860643: length 2
  TOP w0.508: TP1.1 C19.1
  vias: v1(14.7,49.9) v1(14.7,49.1) v1(15.5,49.9) v1(15.5,49.1) v1(16.3,49.9) v1(16.3,49.1) v1(17.1,49.9) v1(17.1,49.1)
N17026698: length 1.7
  TOP w0.203: R21.2 D4.1
N17026724: length 1.7
  TOP w0.203: R25.2 D5.1
N17049848: length 6.1
  TOP w0.254: C1.1 53.59,25.99 54.4,26.8 56.8,26.8 57.8,25.8 U2.1
N17049851: length 3.4
  TOP w0.254: U2.2 56.83,24.27 55.2,25.9 C1.2
N17050982: length 3
  TOP w0.254: C2.1 55.9,24.5 56.63,23.77 U2.3
N17051347: length 6.2
  TOP w0.254: C4.1 52.73,22.27 U2.6
N17051352: length 2.8
  TOP w0.254: U2.7 55.39,21.77 C5.1
N17052473: length 1.6
  TOP w0.203: D1.2 R2.1
N17052478: length 1.6
  TOP w0.203: D2.2 R3.1
N17062865: length 1.7
  TOP w0.203: R19.2 D3.1
N17067274: length 2
  TOP w0.508: U6.1 61.54,55.99 C17.1
N17067309: length 22.7
  TOP w0.203: R32.1 C21.1
  TOP w1.27: TP2.1 51.6,41.6 50.3,40.3 J8.1
N17067388: length 6.8
  TOP w0.203: U6.3 55.91,53.55 R33.1 R32.2
N17067392: length 3.4
  TOP w0.203: U6.4 63.6,52.8 64,52.4 R31.2
N17068207: length 1.4
  TOP w0.203: R34.1 R33.2
N17069780: length 1.7
  TOP w0.203: R28.2 D6.1
N17069783: length 13.4
  TOP w0.203: R28.1 v1(6.66,9.94)
  BOTTOM w0.203: U4.24 17,9.2 16.26,9.94 v1(6.66,9.94)

## Copper pours and planes (outline as drawn; the poured copper is in the pictures)
GND on TOP: 5.9,69.8 94.1,69.8 94.1,64.1 99.8,64.1 99.8,5.9 94.1,5.9 94.1,0.2 5.9,0.2 5.9,5.9 0.2,5.9 0.2,64.1 5.9,64.1 ; 24 cut-outs
GND on BOTTOM: 5.9,69.8 94.1,69.8 94.1,64.1 99.8,64.1 99.8,5.9 94.1,5.9 94.1,0.2 5.9,0.2 5.9,5.9 0.2,5.9 0.2,64.1 5.9,64.1 ; 14 cut-outs
VCC_3.3V on TOP: 42.1,18.5 44.4,20.8 44.4,45.5 44,45.9 42.9,45.9 42.5,45.5 42.5,21.3 40.9,19.7 11.9,19.7 11.5,20.1 11.5,28.9 12.3,29.7 13.7,29.7 13.7,30.1 13.5,30.3 11.1,30.3 10.1,29.3 10.1,19.1 10.7,18.5
VCC_3.3V on TOP: 27.9,31 30.9,31 31,30.9 32.7,30.9 32.7,28.8 31.8,27.9 31.8,26.8 31,26.8 30.9,26.9 30.9,29.9 30.3,30.5 28.3,30.5 27.9,30.9
VCC_3.3V on BOTTOM: 6.3,18.7 6.3,13.8 6.7,13.4 18.6,13.4 19.1,13.9 19.1,19 18.8,19.3 6.9,19.3
VCC_VBUS on TOP: 12.6,48.9 9.7,48.9 9.3,48.5 9.3,46.9 8.8,46.4 7,46.4 6.4,45.8 6.4,45 6.1,44.7 5.4,44.7 5.2,44.5 5.2,43.9 6.7,43.9 7.7,44.9 9.9,44.9 10.6,45.6 10.6,47 11.1,47.5 13,47.5 13,48.5
AISENP on TOP: 75.2,24.9 78.1,24.9 78.3,25.1 78.3,26.3 78.2,26.4 76,26.4 75.7,26.7 75.7,28 76,28.3 78.1,28.3 78.2,28.4 78.2,29.3 78.1,29.4 75.4,29.4 74.5,30.3 74.5,31.4 74.2,31.7 70.5,31.7 70.5,29.7 72.5,29.7 73.7,28.5 73.7,26.4
AOUT1 on TOP: 81.5,29.4 85.9,29.4 87.6,31.1 92.4,31.1 92.8,30.7 92.8,26.9 92.3,26.4 79.7,26.4 79.1,27 79.1,30.5 78.6,31 76.3,31 76.3,32 76.4,32.1 80.8,32.1 81.1,31.8 81.1,29.8
AOUT1 on BOTTOM: 87.9,31.1 92.4,31.1 92.8,30.7 92.8,26.9 92.3,26.4 87.9,26.4 87.6,26.7 87.6,30.8
AOUT2 on TOP: 79.7,26 92.3,26 92.8,25.5 92.8,21.9 92.4,21.5 87.8,21.5 85.6,23.7 81.1,23.7 79.8,22.4 76.3,22.4 76.3,23.6 78.5,23.6 79.1,24.2 79.1,25.4
AOUT2 on BOTTOM: 87.9,26 92.3,26 92.8,25.5 92.8,21.9 92.4,21.5 87.8,21.5 87.6,21.7 87.6,25.7
BISENP on TOP: 78,12.9 74.5,12.9 74,13.4 74,15.7 70.6,15.7 70.6,17.7 78.1,17.7 78.3,17.5 78.3,16.5 78.1,16.3 75.9,16.3 75.7,16.1 75.7,14.4 76,14.1 78,14.1 78.2,13.9 78.2,13.1
BOUT1 on TOP: 76.2,20.3 80.2,20.3 80.9,19.6 80.9,17.9 81.3,17.5 85.4,17.5 88.2,20.3 92.2,20.3 92.8,19.7 92.8,16.1 92,15.3 79.5,15.3 78.9,15.9 78.9,18.6 78.5,19 76.2,19 76.1,19.1 76.1,20.2
BOUT1 on BOTTOM: 87.9,20.7 92.4,20.7 92.8,20.3 92.8,16.1 92,15.3 87.9,15.3 87.6,15.6 87.6,20.4
BOUT2 on TOP: 86.7,11.8 81.3,11.8 80,10.5 76.3,10.5 76.3,11.5 78.4,11.5 78.9,12 78.9,14.1 79.5,14.7 92.8,14.7 92.9,14.6 92.9,11 92.6,10.7 87.8,10.7
BOUT2 on BOTTOM: 87.9,14.7 92.3,14.7 92.8,14.2 92.8,10.8 92.4,10.4 88,10.4 87.6,10.8 87.6,14.4
VM on TOP: 51.5,25 51.5,23.1 52,22.6 56.4,22.6 56.8,23 56.8,23.5 56.7,23.6 54.4,23.6 54,24 54,25
VM on TOP: 81.7,11.3 86.3,11.3 87.2,10.4 87.2,8.3 86.7,7.8 82.1,7.8 81.7,8.2
VM on TOP: 81.7,23.3 85.3,23.3 87.3,21.3 87.3,20.1 85.1,17.9 81.7,17.9
VM on TOP: 84,52.5 86.6,49.9 86.6,30.7 85.7,29.8 81.7,29.8 81.7,32.9 77.3,37.3 77.3,52.2 76.2,53.3 65.4,53.3 64.5,54.2 63,54.2 63,54.8 64.5,54.8 65.5,55.8 76.2,55.8 77.3,56.9 77.3,66.1 77.9,66.7 83.4,66.7 84,66.1
VM on BOTTOM: 93,44.1 78.9,44.1 77,46 77,66.2 77.6,66.8 83.7,66.8 84.2,66.3 84.2,60.6 85.1,59.7 88.1,59.7 89,58.8 89,51.4 90.3,50.1 93,50.1 93.9,49.2 93.9,45
VM on BOTTOM: 53.2,36.8 85.8,36.8 87,35.6 87,7.6 86.8,7.4 82.1,7.4 81.6,7.9 81.6,33.6 80.7,34.5 56.7,34.5 55.7,33.5 55.7,22.9 55.4,22.6 51.9,22.6 51.4,23.1 51.4,35
N16860643 on TOP: 17.5,47 14.5,47 14.2,47.3 14.2,50 14.5,50.3 17.3,50.3 17.7,49.9 17.7,47.2
N16860643 on BOTTOM: 14.5,50.6 45.9,50.6 47,49.5 47,44 45,44 45,48 44.4,48.6 14.5,48.6 14.3,48.8 14.3,50.4
N17067272 on TOP: 62.8,55.1 64.1,55.1 64.6,55.6 64.6,58.8 64.8,59 67.9,59 68.1,59.2 68.1,60.2 67.9,60.4 64.8,60.4 64.6,60.6 64.6,64.3 64.5,64.4 62.3,64.4 62.3,58.5 62.6,58.2 62.6,55.3
N17067309 on TOP: 54.6,56.2 54.6,58.1 54.7,58.2 59.5,58.2 59.5,64.3 57.3,64.3 57.3,61.6 56.6,60.9 51.2,60.9 50.9,60.6 50.9,56.5 51.4,56 54.4,56

Small or netless copper shapes (teardrops, artwork), in the pictures only: 215 on TOP, 63 on BOTTOM

## Text on the board
Ref Des/Silkscreen Bottom: NAME:DRV8711_TEST_V10A.BRD | DATE:2019_02_15 | BY:  XXXLZJXXX
Ref Des/Silkscreen Top: GND | 3V3 | TX | RX | SWCLK | SWDIO | LED0 | LED1 | POWER | BLUTOOTH | KEY0 | KEY1 | WK_UP | SLEEP | RESET | FAULT | STALL | AIN1 | AIN2 | BIN1 | BIN2 | SCK | MOSI | SCS | MISO | USB POWER | EXT POWER | VM | A1 | A2 | B1 | B2
DISPLAY_TOP: SCALE: NONE | Layers | Single Ended | Differential | If the angle of PCB board outline is circular,please use this kind of break out area | If not use it,please delete it before you gerber out | If the angle of PCB board outline is right angle,please use this kind of break out area | AS usual,please use the 0.8MM stamp Via | L1 | L4 | 5.00 | 50 | 4.2 | 6.00 | 100 | 4.70 | 90 | Trace Width | (Mils) | Impedance | (Ohms) | Trace Spacing | "Airgap" | A_TARGET:1.53 mm | ___ PUBI (PUBLIC INFORMATION) | ___ FIUO (HY INTERNAL USE ONLY) | ___ FCP (HY CONFIDENTIAL PROPRIETARY) | THIS DOCUMENT CONTAINS INFORMATION | PROPRIETARY TO FREESCALE AND SHALL | NOT BE USED FOR ENGINEERING DESIGN | PROCUREMENT OR MANUFACTURE IN WHOLE | OR IN PART WITHOUT THE CONSENT OF | NXP. | 1. THIS DRAWING SPECIFIES THE REQUIREMENTS FOR A | 2. THE PWB MUST BE LEAD FREE ASSEMBLY PROCESS COMPATIBLE AND MUST BE ABLE TO HANDLE | 3. BASE MATERIAL - LAMINATE AND PREPREG SHALL MEET IPC-4101B-26, 83 or 98 | Tg - MUST BE GREATER THAN OR EQUAL TO 150 DEGREES CELSIUS. | Td - MUST BE GREATER THAN OR EQUAL TO 330 DEGREES CELSIUS. | 4. COPPER FOIL WEIGHT - SEE STACKUP DETAIL 'A' | 5. CHARACTERISTIC IMPEDANCE - SEE DETAIL 'B' | 6. MINIMUM CONDUCTIVE WIDTH/SPACING TO BE .00X"/.00X" | 7. PLATING FINISH - BOTH SIDES ENIG (ELECTROLESS NICKEL IMMERSION GOLD): | 8. ALL THROUGH HOLE VIAS MAY BE PLATED SHUT. | - MUST BE UL RECOGNIZED AND MUST HAVE AN ID THAT CONFORMS TO UL94V-0 | 9. SOLDERMASK - GREEN COLOR (TAIYO OR EQUIVALENT), BOTH SIDES. | 10. SILKSCREEN - WHITE EPOXY INK, BOTH SIDES.  NO SILK ON PADS. | 11. ELECTRICAL TEST - 100% IPCD356. | 12. PRINTED WIRING BOARD IS TO BE INDIVIDUALLY BAGGED. | 13. DRC'S MUST BE RUN ON THE GERBER BEFORE BUILDING BOARDS, | UNLESS PRIOR APPROVAL IS GIVEN IN WRITING BY FREESCALE. | 14. ADD TEARDROPS TO ALL SIGNAL LAYERS. | 15. SOLDER SAMPLES TO BE PROVIDED. | 16. BASIC GRID INCREMENT AT 1:1 IS .0001. | 17. SUPPLIER MARKINGS - ON SOLDER SIDE ONLY, WHERE SHOWN. | MODIFICATION OF SOLDERMASK IS NOT ALLOWED WITHOUT WRITTEN PERMISSION FROM FREESCALE. | WITH SPECIFICATION IPC-A-600 CLASS 2 (LATEST REVISION). | A MINIMUM OF 5 CYCLES AT 260 DEGREES CELSIUS FOR 10 SECONDS. | 18. THE PWB WILL BE MARKED AS LEAD FREE BY USE OF AN INK STAMP Pb | 19. THE PWB WILL BE MARKED AS LEAD FREE PROCESS COMPATIBLE BY USE OF AN INK STAMP 260 C | 21. FINISHED PCB MUST BE PANELIZED FOR ASSEMBLY ACCORDING TO CONTRACT MANUFACTURING REQUIREMENT. | ADDITION OF .25" RAILS AND .125" NON-PLATED TOOLING HOLES ARE AT THE DISCRETION | OF CONTRACT MANUFACTURER AND FAB HOUSE. | PANELIZATION MUST BE APPROVED BY FREESCALE. | 2.540-6.350 MICRON (100-250 MICROINCH) OF NICKEL. | .05080-.232 MICRON (2-8 MICROINCH) OF GOLD OVER | PRINTED WIRING BOARD IN ACCORDANCE | 20. ALL PLATED AND NON-PLATED THROUGH HOLES ARE TO BE DRILLED AT PRIMARY DRILL STEP. | ALL HOLE LOCATION TOLERANCES ARE TO BE +/-.002 IN REFERENCE TO THE PRIMARY DATUM. | X | XXXLZJXXX | V10A | 19_02_15 | 19-02-15 | JLC:  1.6mm THK +/- 10% | LAYER 1  TOP SIDE          1oz+plating | LAYER 2  BOTTOM SIDE       1oz+plating | FINISHED Cu WEIGHT | NO-***** | 1/1 | CAD-***** | 1 | DETAIL A | LAYER STACKUP | DETAIL B | IMPEDANCE REQUIREMENTS | IMPEDANCE TOLERANCE IS 10% | DRV8711_TEST_V10A | FAB-***** | A2 | HYOC
DEVICE_TYPE_TOP: FIGURE | FINISHED_SIZE | 0.3048 | 0.9 | 1.0 | 1.1 | 1.8 | 2.5x1.0 | 3.0x1.0 | DRILL CHART: TOP to BOTTOM | ALL UNITS ARE IN MILLIMETERS | ROTATION | - | 90.000 | 0.000 | PLATED | QTY | 445 | 2 | 6 | 27 | 1 | 491 | TOTAL HOLES:
